# Altium PCB latest_Audio_Meter_V4.5.PcbDoc (part 1 of 4)
Units mil, origin at the board's own origin, x right, y up, seen from the top; angles counter-clockwise.
Board outline 2756.14 x 2519.69 mil, 2 copper layers (Top Layer, Bottom Layer), stack 57.087 mil thick; 115 components, 61 nets, 352 pads, 840 vias.
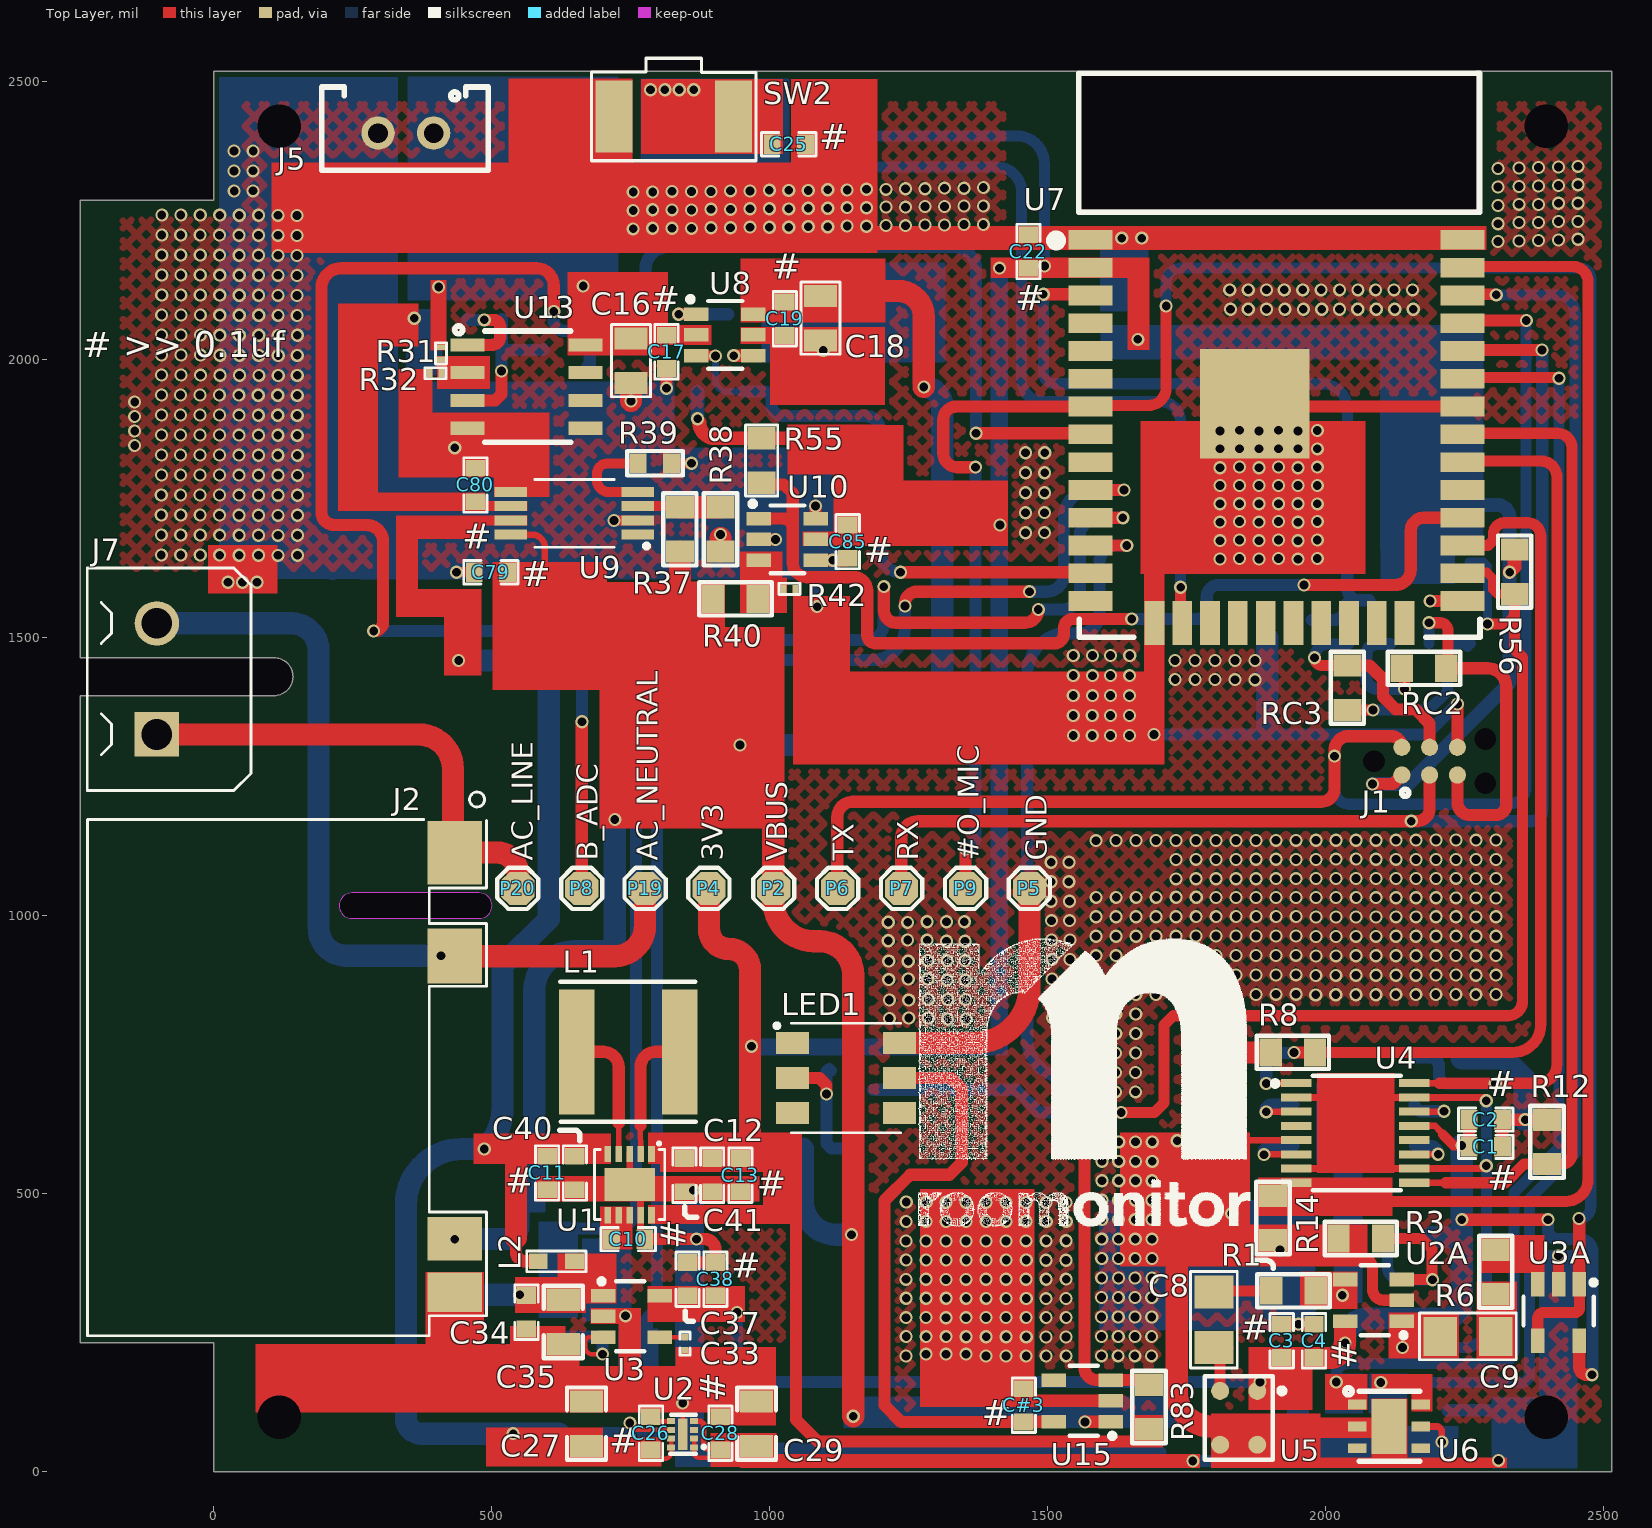
[diagram p0: Top Layer view]
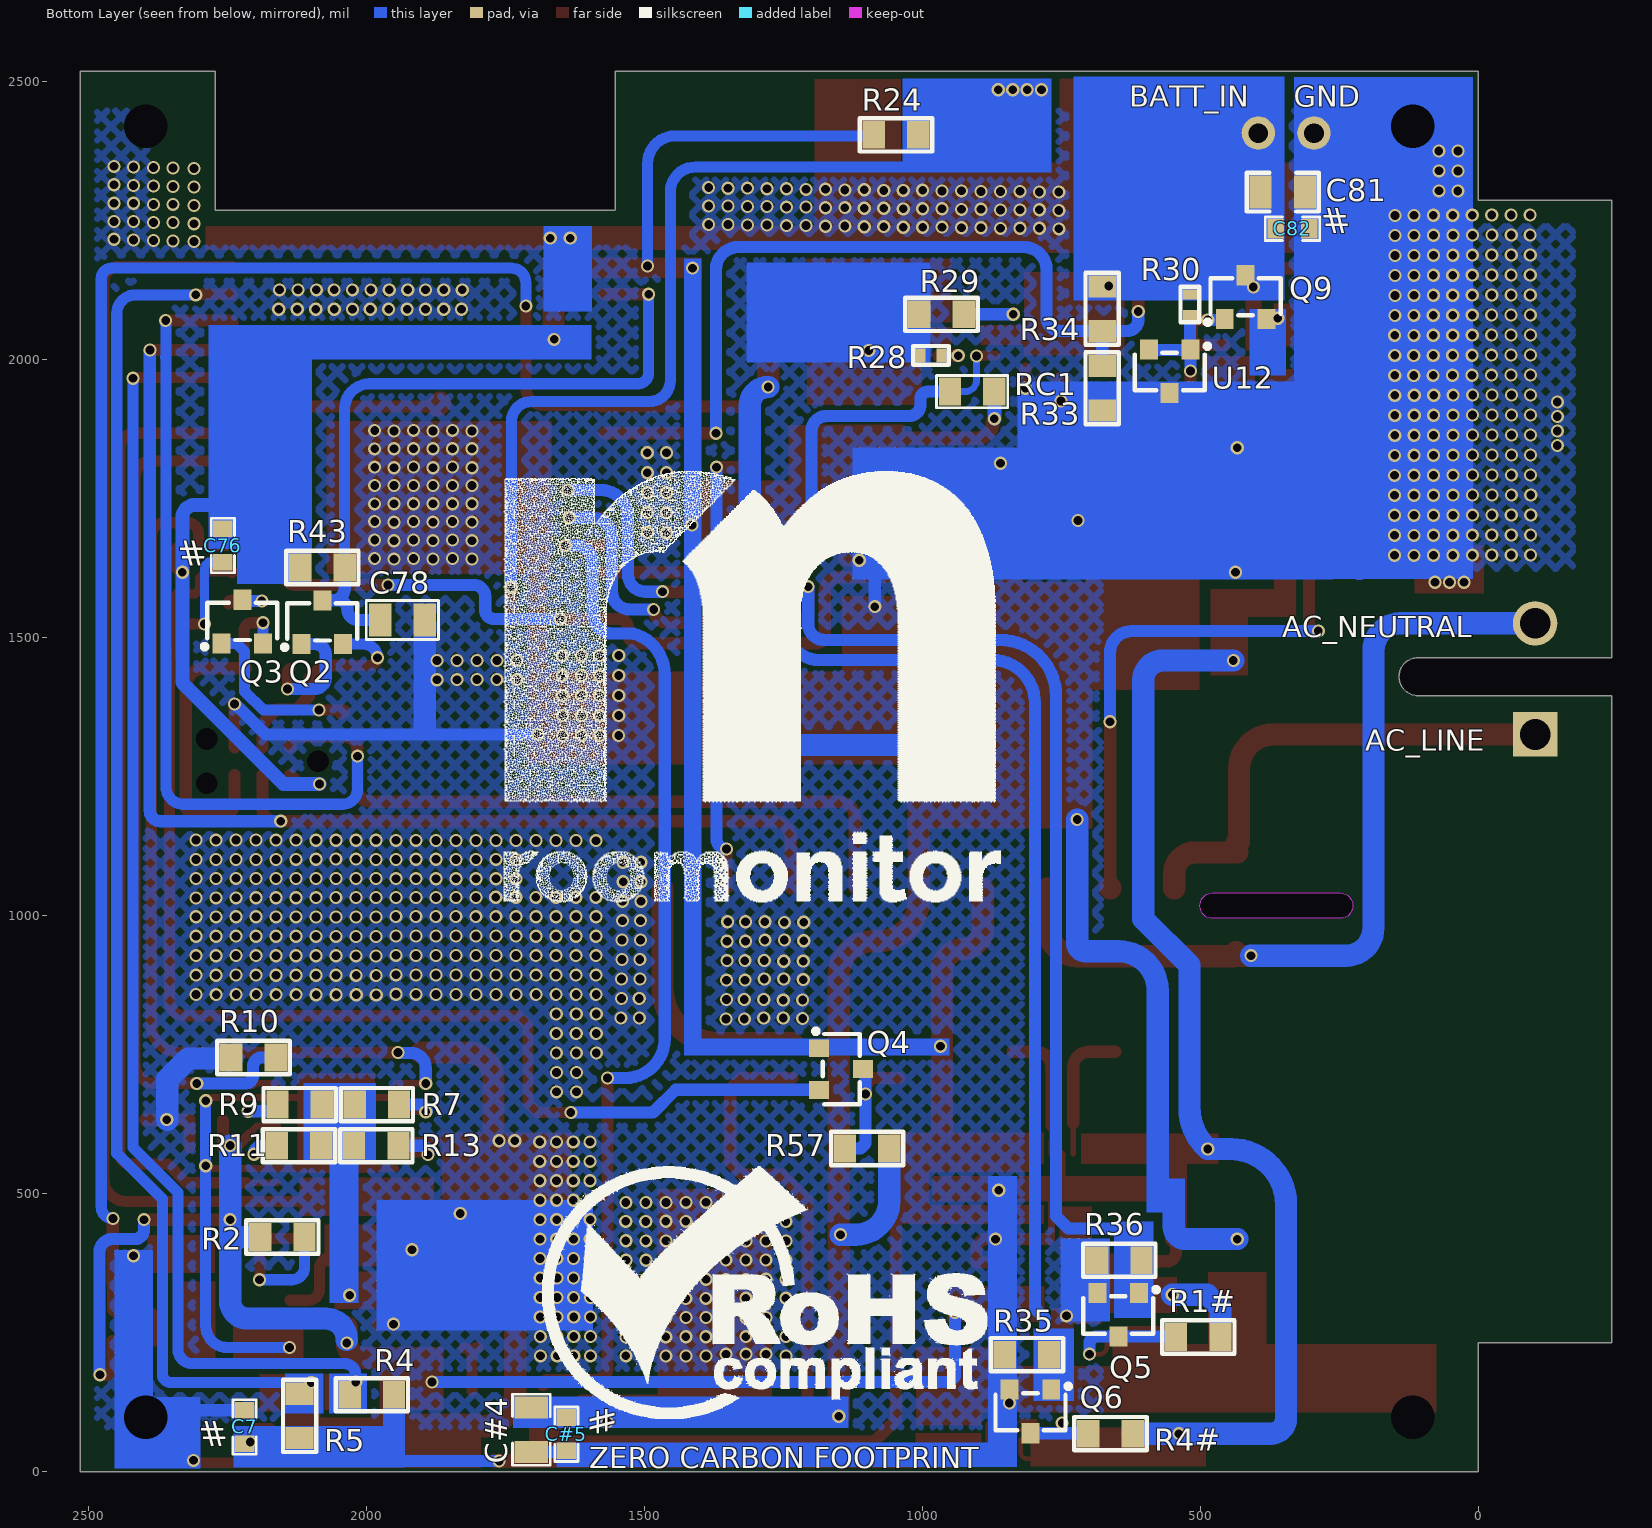
[diagram p1: Bottom Layer view, seen from below]
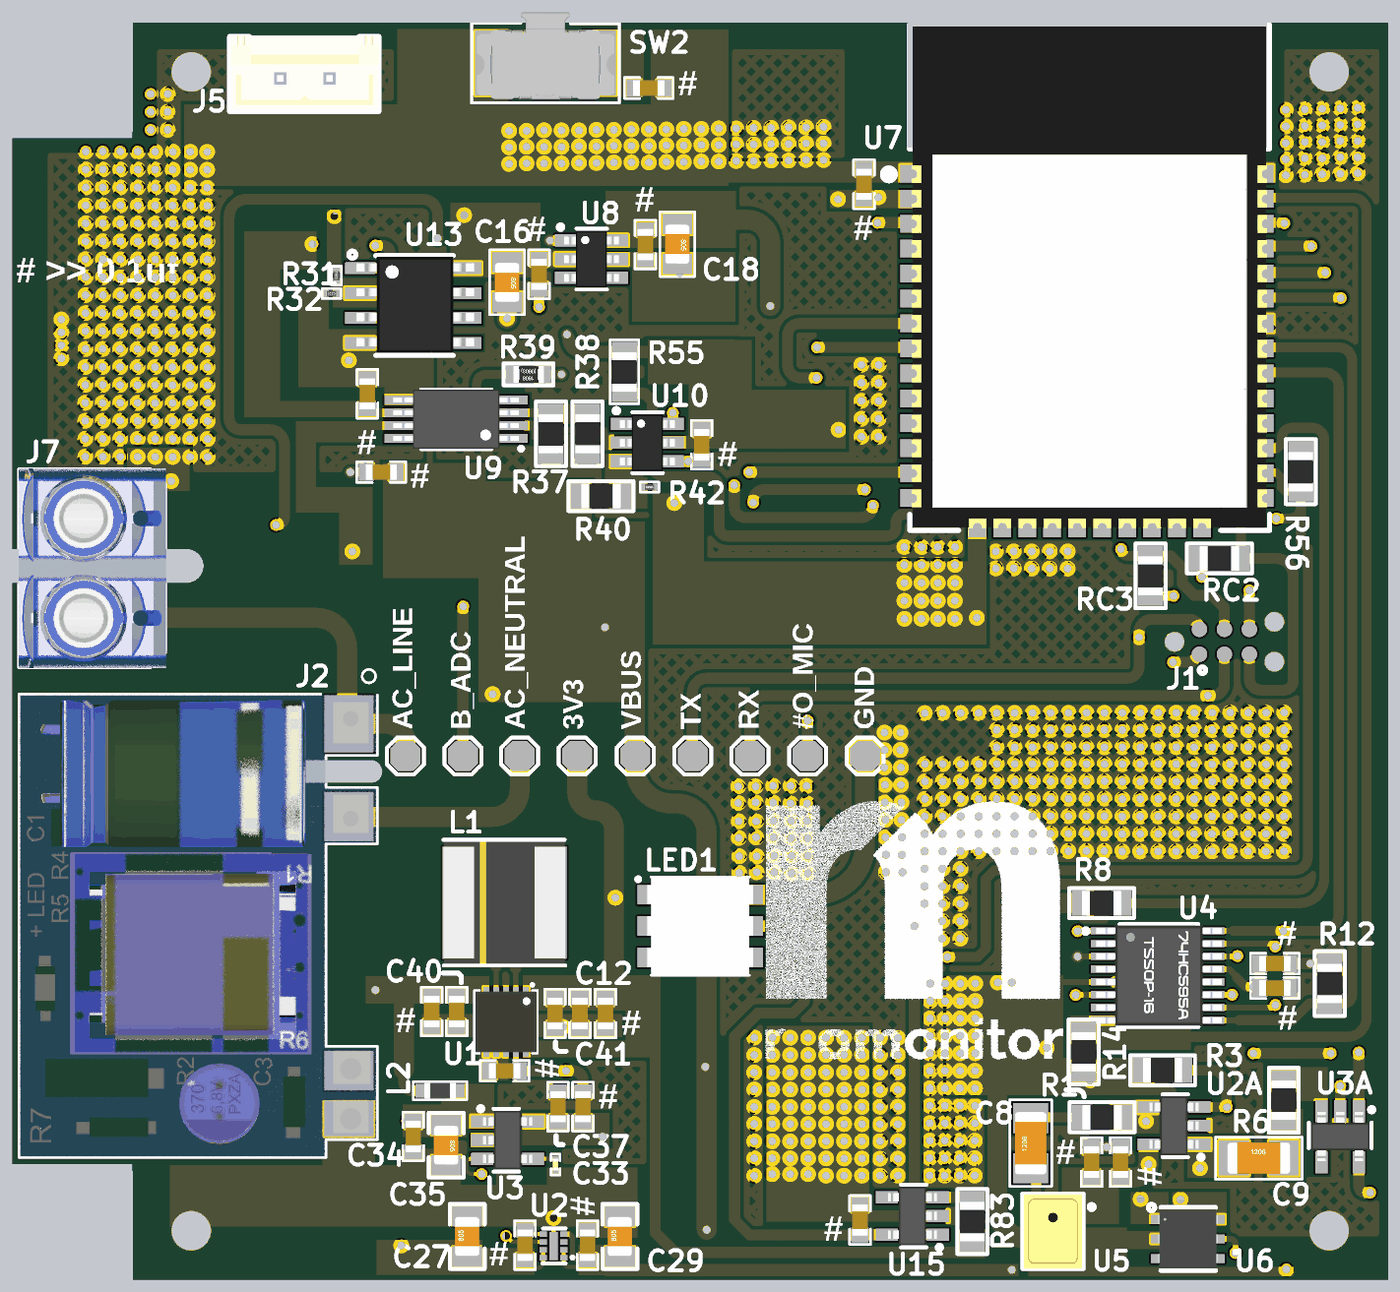
[diagram p3: 3D render of the assembled board from above, using the file's embedded part models]
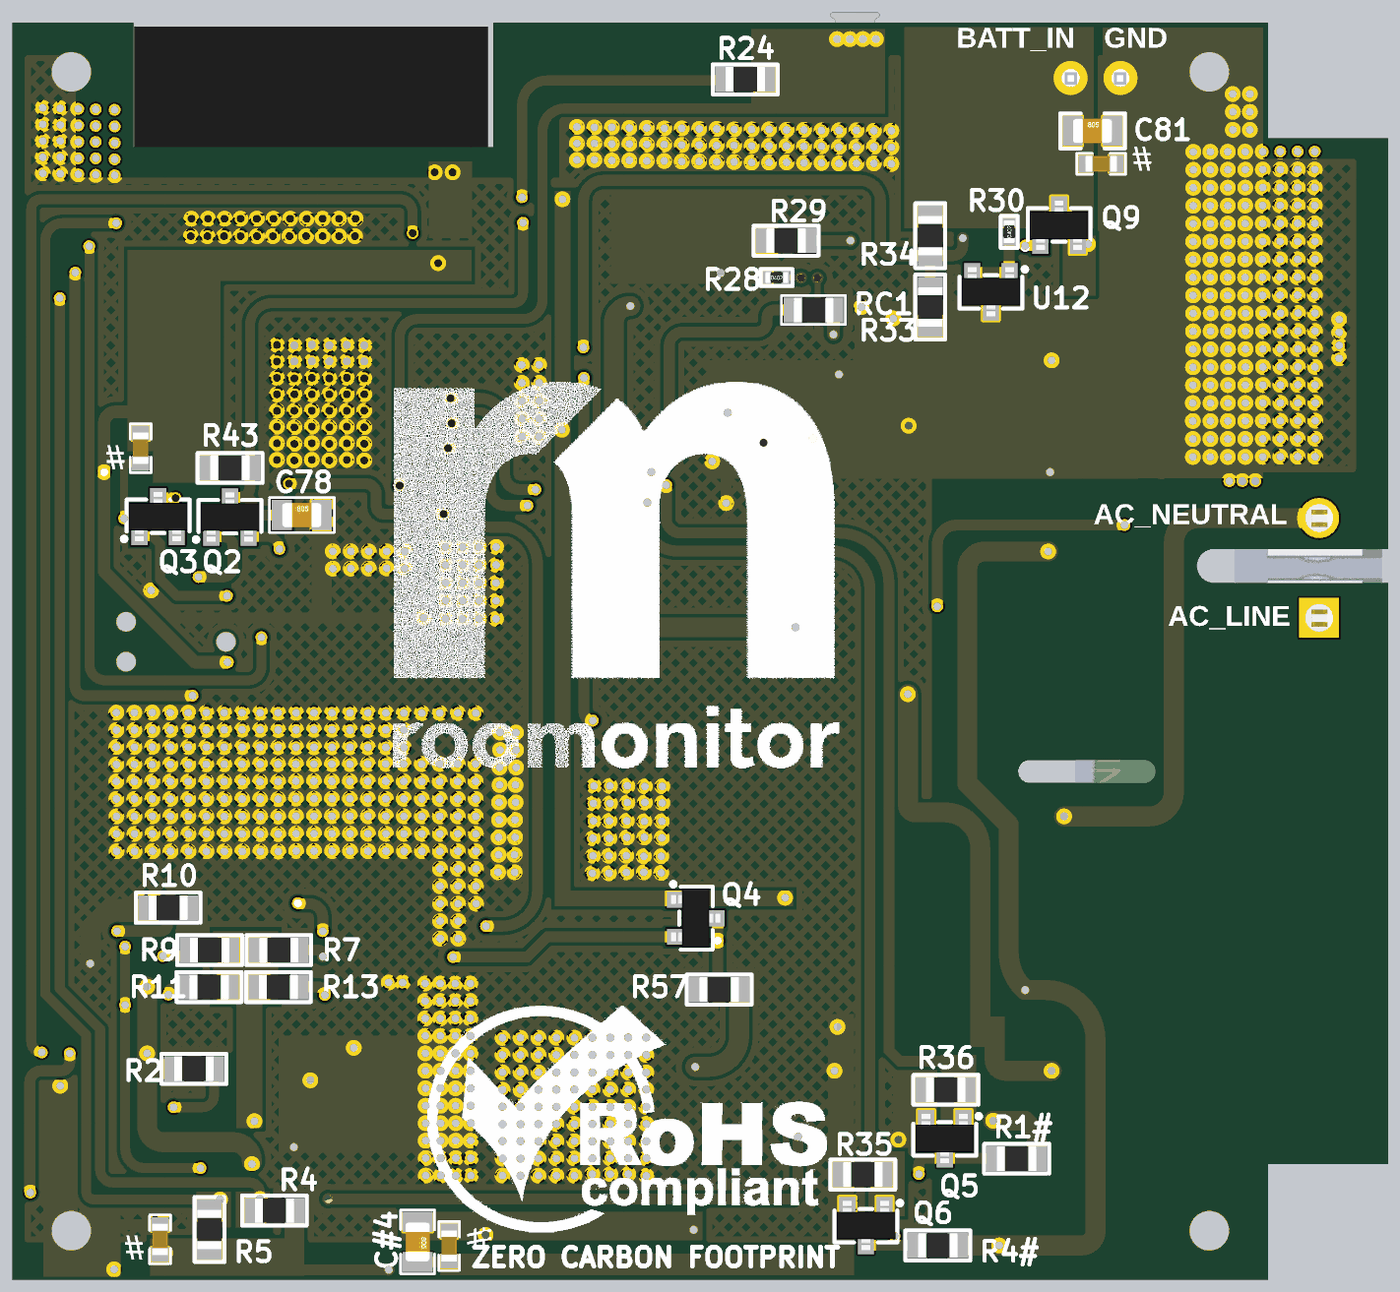
[diagram p4: 3D render of the assembled board from below, using the file's embedded part models]

## Layer stack, top to bottom
Top Solder: solder mask 2.7559, Solder Resist, Dk 3.5
Top Layer: signal copper 13.7795
Dielectric 1: dielectric 29.5276, FR-4, Dk 4.8
Bottom Layer: signal copper 13.7795
Bottom Solder: solder mask 3.1496, Solder Resist, Dk 3.5

## Board outline
-240.16,231.28 0,231.28 0,-0.69 2515.98,-0.68 2515.98,2519 2273,2519 2273,2269 1553,2269 1553,2519 0,2519 0,2287.03 -240.16,2287.03 -240.16,1464 109,1464 cw(c109,1430) 143,1430 cw(c109,1430) 109,1396 -240.16,1396
cut-out: 226,1018 ccw(c249,1018) 249,995 478,995 ccw(c478,1018) 501,1018 ccw(c478,1018) 478,1041 249,1041 ccw(c249,1018)

## Design rules (kind name [scope] priority, off if disabled: settings)
Clearance [All] p1: gap=7 ignorepadtopadclearanceinfootprint=FALSE except(3: Arc-SMDPad Track-SMDPad SMDPad-SMDPad)
ComponentClearance [All] p1: gap=0 collisioncheckmode=3 verticalgap=0 showdistances=FALSE
MinimumSolderMaskSliver [All] p1: minsoldermaskwidth=0
PolygonConnect [All] p1: connectstyle=Direct reliefconductorwidth=10 reliefentries=4 polygonreliefangle="90 Angle" airgapwidth=10
RoutingVias [All] p1: holewidth=15.75 width=23.62 viastyle="Through Hole" minholewidth=15.75 minwidth=23.62 maxholewidth=28 maxwidth=50
SilkToSilkClearance [All] p1: silktosilkclearance=0
SilkToSolderMaskClearance [IsPad] p1: minsilkscreentomaskgap=0 clearancetoexposedcopper=TRUE
SolderMaskExpansion [All] p1: expansion=4
Width [All] p1: maxlimit=40 minlimit=8 preferedwidth=12
26 further rules are at their usual default settings.

## Classes and differential pairs
component class U_SourceSelector_Section: C79 C80 C85 R37 R38 R39 R40 R42 R55 U9 U10
component class U_Supply_Section: J2
component class U_Sensor_Section: C7 C#3 C#4 C#5 LED1 R4 R5 R83 U6 U15
component class U_Power_Section: C10 C11 C12 C13 C27 C28 C29 C34 C35 C37 C38 C40 C41 L1 L2 Q5 Q6 R1# R4# R35 R36 S U1 U2 U3
component class U_Controller_Section: C22 C25 C76 C78 Q2 Q3 Q4 R24 R43 R56 R57 RC2 RC3 SW2 U7
component class U_Connector_Section: C81 C82 J1 J5 J7 P2 P4 P5 P6 P7 P19 P20
component class "U_Battery management Section": C16 C17 C18 C19 P8 Q9 R28 R29 R30 R31 R32 R33 R34 RC1 U8 U12 U13
component class U_Audio_Section: C1 C2 C3 C4 C8 C9 P9 R1 R2 R3 R6 R7 R8 R9 R10 R11 R12 R13 R14 U2A U3A U4 U5

## Components (designator, comment, footprint, x,y, rotation, side; value= is the part's Value field where it differs from the comment)
C1 "0.1uF" Cap0603 2289,584 r0 top
C2 "0.1uF" Cap0603 2289,633 r0 top
C3 "0.1uF" Cap0603 1922,235 r90 top
C4 "0.1uF" Cap0603 1980,235 r90 top
C7 "0.1uF" Cap0603 2220,80 r90 bottom
C8 "1206YC105K4T2A" Cap1206 1800,273 r90 top
C9 "1206YC105K4T2A" Cap1206 2257,243 r0 top
C10 "0.1uF" Cap0603 746,418 r0 top
C11 "0.1uF" Cap0603 600,537 r270 top
C12 "10uF" Cap0603 897,533 r270 top
C13 "0.1uF" Cap0603 948,533 r270 top
C16 "1uF" Cap0805#1 751,1998.57 r270 top
C17 "0.1uF" Cap0603 815,2014.57 r270 top
C18 "1uF" Cap0805#1 1092,2075 r270 top
C19 "0.1uF" Cap0603 1028,2074 r270 top
C22 "0.1uF" Cap0603 1466,2195 r90 top
C25 "0.1uF" Cap0603 1035,2388 r0 top
C26 "0.1uF" Cap0603 787,68.56 r90 top
C27 "1uF" Cap0805#2 671,86 r90 top
C28 "0.1uF" Cap0603 912,68.56 r90 top
C29 "1uF" Cap0805#2 977,86 r90 top
C33 "10nF" "CAP 0201" 848,230 r270 top
C34 "10uF" Cap0603 563,286.44 r270 top
C35 "1uF" Cap0805#2 629,269 r270 top
C37 "10uF" Cap0603 853,346 r90 top
C38 "0.1uF" Cap0603 903,346 r90 top
C40 "10uF" Cap0603 650,537 r270 top
C41 "10uF" Cap0603 847,533 r270 top
C76 "0.1uF" Cap0603 2259,1666 r270 bottom
C78 "1uF" Cap0805#1 1936,1532 r180 bottom
C79 "0.1uF" Cap0603 499,1618 r180 top
C80 "0.1uF" Cap0603 471,1775 r90 top
C81 "4.7UF" Cap0805#2 352,2302 r180 bottom
C82 "0.1uF" Cap0603 334.56,2236 r180 bottom
C85 "0.1uF" Cap0603 1141,1673 r270 top
C#3 "0.1uF" Cap0603 1458,119 r90 top
C#4 "1uF" Cap0805#2 1704,75 r270 bottom
C#5 "0.1uF" Cap0603 1641,67 r270 bottom
J1 "TC2030-IDC" TC2030-IDC 2188,1278 r0 top
J2 "SMD Header" "SMD Header" 434.08,721 r90 top locked
J5 "B2B-EH-A(LF)(SN)" B2B-EH-A(LF)(SN) 346,2408 r180 top
J7 "Terminal Block 2POS" "Terminal Block 2P" -102,1326 r90 top
L1 "NR6028T1R5N" NR6028T1R5N 746,755 r0 top
L2 "BLM18SG121TN1D" "IND 0603" 617,378 r0 top
LED1 "COM-11821" COM-11821 1138,708 r0 top locked
P2 "TEST POINT" "TEST POINT" 1007.75,1049 r180 top
P4 "TEST POINT" "TEST POINT" 891.38,1049 r0 top
P5 "TEST POINT" "TEST POINT" 1468,1049 r0 top
P6 "TEST POINT" "TEST POINT" 1122.81,1049 r0 top
P7 "TEST POINT" "TEST POINT" 1237.88,1049 r0 top
P8 "TEST POINT" "TEST POINT" 662.56,1049 r90 top
P9 "TEST POINT" "TEST POINT" 1352.94,1049 r270 top
P19 "TEST POINT" "TEST POINT" 776.31,1049 r270 top
P20 "TEST POINT" "TEST POINT" 547.5,1049 r0 top
Q2 "MMBT2222A-7-F" SOT-23 2080,1528 r180 bottom
Q3 "MMBT2222A-7-F" SOT-23 2224,1529 r180 bottom
Q4 "BSS138LT1G" SOT-23 1147,724 r270 bottom
Q5 "BSS138LT1G" SOT-23 648,282 r0 bottom
Q6 "BSS138LT1G" SOT-23 806,108 r0 bottom
Q9 "PMV65XP,215" SOT-23 419,2113 r180 bottom
R1 "1K" "RES 0805" 1943,325 r0 top
R1# "10K" "RES 0805" 504,242 r180 bottom
R2 "10K" "RES 0805" 2152,422 r0 bottom
R3 "10K" "RES 0805" 2064,419 r180 top
R4 "10K" "RES 0805" 1991,138 r180 bottom
R4# "10K" "RES 0805" 662,68 r180 bottom
R5 "10K" "RES 0805" 2121,100 r270 bottom
R6 "1K" "RES 0805" 2307,359 r270 top
R7 "47K" "RES 0805" 1982,660 r0 bottom
R8 "10K" "RES 0805" 1942,754 r0 top
R9 "100K" "RES 0805" 2121,660 r180 bottom
R10 "10K" "RES 0805" 2204,745 r180 bottom
R11 "220K" "RES 0805" 2122,586 r180 bottom
R12 "10K" "RES 0805" 2399,593 r270 top
R13 "470K" "RES 0805" 1983,586 r0 bottom
R14 "10K" "RES 0805" 1906,456 r90 top
R24 "10K" "RES 0805" 1048,2405 r0 bottom
R28 "665R" Res0402 985,2008 r180 bottom
R29 "10K" "RES 0805" 966,2082 r180 bottom
R30 "30.9K" Res0402 519,2099.5 r90 bottom
R31 "28K" Res-0201 409.17,2011.83 r90 top
R32 "20K" Res-0201 399.17,1976 r180 top
R33 "1M" "RES 0805" 677,1949 r270 bottom
R34 "1M" "RES 0805" 677,2092 r90 bottom
R35 "10K" "RES 0805" 812.33,210 r0 bottom
R36 "10K" "RES 0805" 646,380 r0 bottom
R37 "10K" "RES 0805" 839,1695 r270 top
R38 "10K" "RES 0805" 912,1695 r90 top
R39 "400R" Res0603 794,1814 r0 top
R40 "10K" "RES 0805" 939,1570 r180 top
R42 "20K" Res-0201 1036.17,1588 r0 top
R43 "10K" "RES 0805" 2080,1626.44 r0 bottom
R55 "10K" "RES 0805" 986,1819 r270 top
R56 "10K" "RES 0805" 2341,1619 r270 top
R57 "10K" "RES 0805" 1100,581 r0 bottom
R83 "10K" "RES 0805" 1683,116 r90 top
RC1 "10K" "RES 0805" 911,1943 r180 bottom
RC2 "10K" "RES 0805" 2178,1445 r0 top
RC3 "10K" "RES 0805" 2040,1410 r90 top
SW2 "Switch" KSS221GLFS 828,2438 r180 top
U1 "TPS63031DSKR" TPS63031DSKR 748.63,516.12 r270 top
U2 "NCP186AMX330TAG" NCP186AMX330TAG 844,67 r180 top
U2A "OPA344NA/250" SOT23-5 2087,308 r180 top locked
U3 "LP2985A-33DBVT" SOT23-5 752,279 r0 top
U3A "OPA344NA/250" SOT23-5 2420,286 r270 top locked
U4 "ADG712BRUZ-REEL" 16-TSSOP 2057,609 r0 top locked
U5 "SPU0410HR5H-PB" SPU0410HR5H-PB 1811.07,145 r0 top locked
U6 "SI7021-A20-GM1R" SI7021-A20-GM1R 2115,81 r0 top
U7 "ESP32-WROOM-32 (16MB)" "ESP32-WROOM-32 (16MB)" 1912.65,1871.31 r0 top
U8 "BQ21040DBVR" SOT-23-6 920,2045 r0 top
U9 "TPS2111APWR" 8-TSSOP 649,1724 r180 top
U10 "TPS3711DDCT" SOT-23-6 1032,1677 r0 top
U12 "TLV431BFTA" SOT-23 555.6,1979.63 r0 bottom
U13 "LM393DT" LM393DT 563,1952 r0 top
U15 "MIC2004-0.5YM5-TR" SOT23-5 1563,127 r180 top

## Footprints (in the part's own frame and the unit in brackets; to place one, negate y for a bottom-side part, rotate by r counter-clockwise, add the part's x,y. Pads: shape width x height; smd on the part's side, far side on the other; paste and mask are expansions set on the pad)
8-TSSOP [mm]
  rect 1.5x0.45 smd: 1(-2.9,0.975) 2(-2.9,0.325) 3(-2.9,-0.325) 4(-2.9,-0.975) 5(2.9,-0.975) 6(2.9,-0.325) 7(2.9,0.325) 8(2.9,0.975)
  silkscreen extent -3.38,-1.55 1.8,1.57, body extent -3.2,-1.5 3.2,1.5, height 1.2
16-TSSOP [mm]
  rect 1.4x0.37 smd: 1(-2.775,2.275) 2(-2.775,1.625) 3(-2.775,0.975) 4(-2.775,0.325) 5(-2.775,-0.325) 6(-2.775,-0.975) 7(-2.775,-1.625) 8(-2.775,-2.275) 9(2.625,-2.275) 10(2.625,-1.625) 11(2.625,-0.975) 12(2.625,-0.325) 13(2.625,0.325) 14(2.625,0.975) 15(2.625,1.625) 16(2.625,2.275)
  silkscreen extent -3.85,-2.62 2.01,2.62, body extent -3.2,-2.55 3.2,2.55, height 1.2
B2B-EH-A(LF)(SN) [mil]
  round 60 hole 35.43: 1(-50,0) 2(50,0)
  silkscreen extent -148,-83 151,67, body extent -148,-86 148,64, height 244
Cap0603 [mil]
  rect 30x35 smd mask+2.36: 1(-30,0) 2(30,0)
  silkscreen extent -49,-21 49,21, body extent -32,-16 31,16, height 34
Cap0805#1 [mil] "SMD 0805"
  rect 40x60 smd: 1(-40,0) 2(40,0)
  silkscreen extent -65,-35 65,35, body extent -39,-25 39,25, height 30
Cap0805#2 [mil] "SMD 0805"
  rect 40x60 smd mask+2.76: 1(-40,0) 2(40,0)
  silkscreen extent -65,-35 65,35, body extent -39,-25 39,25, height 30
Cap1206 [mil] "SMD 1206"
  rect 60x70 smd: 1(-50,0) 2(50,0)
  silkscreen extent -87,-42 87,42, body extent -63,-31 63,32, height 39
"CAP 0201" [mm]
  rect 0.3x0.3 smd: 1(-0.3,0) 2(0.3,0)
  silkscreen extent -0.53,-0.23 0.53,0.23, body extent -0.3,-0.15 0.3,0.15, height 0.28
COM-11821 [mm]
  rect 1.5x1 smd: 1(-2.45,1.6) 2(-2.45,0) 3(-2.45,-1.6) 4(2.45,-1.6) 5(2.45,0) 6(2.45,1.6)
  silkscreen extent -3.26,-2.5 2.5,2.5, body extent -2.7,-2.5 2.7,2.5, height 1.75
"ESP32-WROOM-32 (16MB)" [mm]
  rect 2x0.9 smd: 1(-8.5,8.755) 2(-8.5,7.485) 3(-8.5,6.215) 4(-8.5,4.945) 5(-8.5,3.675) 6(-8.5,2.405) 7(-8.5,1.135) 8(-8.5,-0.135) 9(-8.5,-1.405) 10(-8.5,-2.675) 11(-8.5,-3.945) 12(-8.5,-5.215) 13(-8.5,-6.485) 14(-8.5,-7.755) 25(8.5,-7.755) 26(8.5,-6.485) 27(8.5,-5.215) 28(8.5,-3.945) 29(8.5,-2.675) 30(8.5,-1.405) 31(8.5,-0.135) 32(8.5,1.135) 33(8.5,2.405) 34(8.5,3.675) 35(8.5,4.945) 36(8.5,6.215) 37(8.5,7.485) 38(8.5,8.755)
  rect 0.9x2 smd: 15(-5.58,-8.755) 16(-4.31,-8.755) 17(-3.04,-8.755) 18(-1.77,-8.755) 19(-0.5,-8.755) 20(0.77,-8.755) 21(2.04,-8.755) 22(3.31,-8.755) 23(4.58,-8.755) 24(5.85,-8.755)
  rect 5x5 smd: 39(-0.991,1.27)
  silkscreen extent -10.28,-9.4 9.3,16.38, body extent -8.91,-9.3 9.16,16.24, height 3.01
"IND 0603" [mm]
  rect 0.85x0.7 smd: 1(-0.825,0) 2(0.825,0)
  silkscreen extent -1.36,-0.47 1.35,0.47, body extent -0.8,-0.4 0.8,0.4, height 0.8
KSS221GLFS [mil] "Tactile Switch SPST-NO Side Actuated Surface Mount, Right Angle"
  rect 66.93x130 smd: 1(-107.3,0) 2(107.3,0)
  silkscreen extent -148,-105 148,80, body extent -138,-101 138,72, height 65
LM393DT [mm]
  rect 1.55x0.6 smd: 1(-2.7,1.905) 2(-2.7,0.635) 3(-2.7,-0.635) 4(-2.7,-1.905) 5(2.7,-1.905) 6(2.7,-0.635) 7(2.7,0.635) 8(2.7,1.905)
  silkscreen extent -3.28,-2.54 2.03,2.77, body extent -2.91,-2.41 3.09,2.49, height 1.65
NCP186AMX330TAG [mm]
  rect 0.37x0.28 smd: 1(-0.525,0.6) 2(-0.525,0.2) 3(-0.525,-0.2) 4(-0.525,-0.6) 5(0.525,-0.6) 6(0.525,-0.2) 7(0.525,0.2) 8(0.525,0.6)
  rect 0.44x1.44 smd: 9(0,0)
  silkscreen extent -1.02,-0.89 0.56,0.89, body extent -0.6,-0.8 0.6,0.8, height 0.39
NR6028T1R5N [mm] "FIXED IND 1.5UH 4.2A 20.8 MOHM"
  rect 1.62x5.72 smd: 1(-2.35,0) 2(2.35,0)
  silkscreen extent -3.11,-3.2 3.09,3.2, body extent -3.11,-3.1 3.09,3.1, height 2.79
Res0402 [mil]
  rect 18x25 smd mask+4: 1(-18.5,0) 2(18.5,0)
  silkscreen extent -32,-17 32,17, body extent -23,-11 23,11, height 16
Res0603 [mil]
  rect 30x35 smd: 1(-30,0) 2(30,0)
  silkscreen extent -50,-22 50,22, body extent -31,-17 31,17, height 18
"RES 0805" [mil] "SMD 0805"
  rect 40x50 smd: 1(-40,0) 2(40,0)
  silkscreen extent -65,-30 65,30, body extent -39,-25 39,24, height 24
Res-0201 [mm]
  rect 0.27x0.37 smd: 1(-0.275,0) 2(0.275,0)
  silkscreen extent -0.48,-0.25 0.48,0.25, body extent -0.3,-0.15 0.3,0.15, height 0.29
SI7021-A20-GM1R [mm]
  rect 0.85x0.45 smd: 1(-1.45,1) 2(-1.45,0) 3(-1.45,-1) 4(1.45,-1) 5(1.45,0) 6(1.45,1)
  rect 1.6x2.5 smd: 7(0,0)
  silkscreen extent -2.02,-1.6 1.4,1.76, body extent -1.5,-1.5 1.5,1.5, height 1.22
"SMD Header" [mm]
  rect 2.9x2.5 smd: 1(9.97,0)
  rect 2.5x2.5 smd: 2(5.245,0)
  rect 2x2.5 smd: 3(-7.683,0)
  rect 1.8x2.5 smd: 4(-10.122,0)
  silkscreen extent -12.12,-1.45 12.74,16.79, body extent -12.07,-1.4 11.43,16.75, height 12.59
SOT23-5 [mm] "SOT23-5 Package"
  rect 1.12x0.62 smd: 1(-1.3,0.95) 2(-1.3,0) 3(-1.3,-0.95) 4(1.3,-0.95) 5(1.3,0.95)
  silkscreen extent -1.48,-1.6 0.58,1.71, body extent -1.25,-1.5 1.25,1.5, height 1.09
SOT-23 [mm]
  rect 0.82x0.92 smd: 1(-0.95,-1) 2(0.95,-1) 3(0,1)
  silkscreen extent -1.82,-1.23 1.6,0.86, body extent -1.5,-1.25 1.5,1.25, height 1.1
SOT-23-6 [mm]
  rect 1.12x0.62 smd: 1(-1.3,0.95) 2(-1.3,0) 3(-1.3,-0.95) 4(1.3,-0.95) 5(1.3,0) 6(1.3,0.95)
  silkscreen extent -1.69,-1.55 0.79,1.74, body extent -1.4,-1.45 1.4,1.45, height 1.42
SPU0410HR5H-PB [mm]
  round 0.82 smd: 1(1.7,0) 2(1.7,-2.46) 3(0,-2.46) 4(0,0)
  silkscreen extent -0.71,-3.15 2.95,0.67, body extent -0.62,-3.11 2.33,0.65, height 1.03
TC2030-IDC [mil] "CABLE ADAPTER 6 POS"
  round 30.98 smd: 1(-50,-25) 1(-50,-25) 2(-50,25) 3(0,-25) 4(0,25) 5(50,-25) 6(50,25)
  round 0 hole 39.02: MP5(-100,0) MP6(100,-40) MP7(100,40)
  silkscreen extent -50,-63 -38,-51
"Terminal Block 2P" [mil] "TERMINAL BLOCK 2POS 5.08MM SIDE"
  rect 80x80 hole 55: 1(0,0)
  round 80 hole 55: 2(200,0)
  silkscreen extent -101,-169 299,125, body extent -101,-170 299,125, height 394
"TEST POINT" [mil]
  oct 60x60 smd: 1(0,0)
  silkscreen extent -37,-37 37,37
TPS63031DSKR [mm] "Conv DC-DC 1.8V to 5.5V Non-Inv/Inv/Step Up/Step Down Single-Out 3.3V 0.8A 10-Pin WSON"
  rect 0.75x0.3 smd: 1(-1.4,1) 2(-1.4,0.5) 3(-1.4,0) 4(-1.4,-0.5) 5(-1.4,-1) 6(1.4,-1) 7(1.4,-0.5) 8(1.4,0) 9(1.4,0.5) 10(1.4,1)
  rect 1.5x2.3 smd: 11(0,0)
  silkscreen extent -1.96,-1.6 1.6,1.6, body extent -1.56,-1.55 1.56,1.55, height 0.8

## Part data
C1 C2 C3 C4 C7 C10 C11 C13 C17 C19 C22 C25 C26 C28 C38 C76 C79 C80 C82 C85 C#3 C#5: library part CC0603ZRY5V9BB104, "CAP CER 0.1UF 50V Y5V 0603", Capacitance=100nF, Case/Package=0603, Case Code (Metric)=1608, Dielectric=Y5V, Manufacturer=Yageo, Max Operating Temperature=85°C, Min Operating Temperature=-30°C, Package Quantity=1, Supplier Part Number 1=311-1343-1-ND, Tolerance=80%, Voltage=50V, Case Code (Imperial)=0603, ComponentLink1Description=http://www.yageo.com/documents/recent/UPY-GPHC_Y5V_6.3V-to-50V_8.pdf?src-supplier=Digi-Key, ComponentLink1URL=http://www.yageo.com/documents/recent/UPY-GPHC_Y5V_6.3V-to-50V_8.pdf?src-supplier=Digi-Key, ComponentLink2Description=http://www.yageo.com/documents/recent/UPY-GPHC_Y5V_6.3V-to-50V_5.pdf?src-supplier=Avnet+Europe, ComponentLink2URL=http://www.yageo.com/documents/recent/UPY-GPHC_Y5V_6.3V-to-50V_5.pdf?src-supplier=Avnet+Europe, ComponentLink3Description=https://www.verical.com/server-webapp/html/getDatasheet?partID=403611&src-supplier=Verical, ComponentLink3URL=https://www.verical.com/server-webapp/html/getDatasheet?partID=403611&src-supplier=Verical, ComponentLink4Description=http://www.mouser.com/ds/2/447/Yageo_UPY-GP_NP0_16V-to-50V_9-358835.pdf?src-supplier=Mouser, ComponentLink4URL=http://www.mouser.com/ds/2/447/Yageo_UPY-GP_NP0_16V-to-50V_9-358835.pdf?src-supplier=Mouser, ComponentLink5Description=http://www.farnell.com/datasheets/1132289.pdf?src-supplier=Element14, ComponentLink5URL=http://www.farnell.com/datasheets/1132289.pdf?src-supplier=Element14, Composition=Ceramic, Depth=0.8mm, Halogen Free="Halogen Free", Height=0.8mm, Lead Free="Lead Free", Length=1.6mm, Manufacturer Part Number=CC0603ZRY5V9BB104, Mount="Surface Mount", Number of Pins=2, Packaging="Tape and Reel", Pricing 1="1=0.1, 10=0.075, 100=0.0334, 500=0.02386, 1000=0.01874 (USD)", Radiation Hardening=No, REACH SVHC="No SVHC", Stock 1=15000880, Supplier 1=Digi-Key, Termination=SMD/SMT, Thickness=0.035inch, Voltage Rating=50V, Voltage Rating (DC)=50V, Width=0.031inch
C8 C9: "CAP CER 1UF 16V X7R 1206", Capacitance=1uF, Case/Package=1206, Case Code (Metric)=3216, Dielectric=X7R, Manufacturer="Kyocera AVX", Max Operating Temperature=125°C, Min Operating Temperature=-55°C, Package Quantity=2000, Ratings=AEC-Q200, Supplier Part Number 1=478-10899-1-ND, Tolerance=10%, Voltage Rating=16V, Case Code (Imperial)=1206, ComponentLink1Description=http://www.mouser.com/ds/2/40/AutoMLCC-777028.pdf?src-supplier=Mouser, ComponentLink1URL=http://www.mouser.com/ds/2/40/AutoMLCC-777028.pdf?src-supplier=Mouser, ComponentLink2Description=http://www.avxcorp.com/docs/Catalogs/cauto.pdf?src-supplier=Avnet, ComponentLink2URL=http://www.avxcorp.com/docs/Catalogs/cauto.pdf?src-supplier=Avnet, ComponentLink3Description=http://www.avx.com/docs/Catalogs/cauto.pdf?src-supplier=Future+Electronics, ComponentLink3URL=http://www.avx.com/docs/Catalogs/cauto.pdf?src-supplier=Future+Electronics, ComponentLink4Description=http://www.avx.com/docs/Catalogs/cx7r.pdf?src-supplier=Digi-Key, ComponentLink4URL=http://www.avx.com/docs/Catalogs/cx7r.pdf?src-supplier=Digi-Key, Depth=1.6mm, Lead Free="Lead Free", Length=3.2mm, Manufacturer Part Number=1206YC105K4T2A, Mount="Surface Mount", Packaging="Tape and Reel", Pricing 1="1=0.41, 10=0.285, 100=0.1708, 500=0.12808, 1000=0.10816 (USD)", Radiation Hardening=No, Stock 1=1895, Supplier 1=Digi-Key, Termination=SMD/SMT, Thickness=0.037inch, Voltage Rating (DC)=16V, Width=1.6mm
C12 C34 C37 C40 C41: library part C1608X5R1E106M080AC, "CAP CER 10UF 25V X5R 0603", Case/Package=0603, Case Code (Metric)=1608, Dielectric=X5R, Dielectric Material=Ceramic, Manufacturer=TDK, Max Operating Temperature=85°C, Min Operating Temperature=-55°C, Package Quantity=1, Supplier Part Number 1=445-9015-1-ND, Tolerance=20%, Voltage Rating=25V, Capacitance=10uF, Case Code (Imperial)=0603, Composition=Ceramic, Depth=0.8mm, Height=0.8mm, Lead Free="Lead Free", Length=1.6mm, Manufacturer Part Number=C1608X5R1E106M080AC, Mount="Surface Mount", Packaging="Tape and Reel", Pricing 1="1=0.96, 10=0.704, 100=0.483, 500=0.38238, 1000=0.322 (USD)", REACH SVHC="No SVHC", Stock 1=61681, Supplier 1=Digi-Key, Termination=SMD/SMT, Thickness=0.039inch, Voltage Rating (DC)=25V, Weight=7.1E-05oz, Width=0.8mm
C16 C18 C27 C29 C35 C78 C#4: library part CL21B105KOFNNNG, "CAP CER 1UF 16V X7R 0805", Case/Package=0805, Case Code (Metric)=2012, Dielectric=X7R, Manufacturer=Samsung, Max Operating Temperature=125°C, Min Operating Temperature=-55°C, Package Quantity=3000, Supplier Part Number 1=1276-6471-6-ND, Tolerance=10%, Voltage=16V, Capacitance=1uF, Case Code (Imperial)=0805, ComponentLink1Description=http://www.samsungsem.com/global/support/library/product-catalog/__icsFiles/afieldfile/2014/11/13/MLCC.pdf?src-supplier=Digi-Key, ComponentLink1URL=http://www.samsungsem.com/global/support/library/product-catalog/__icsFiles/afieldfile/2014/11/13/MLCC.pdf?src-supplier=Digi-Key, ComponentLink2Description=http://www1.futureelectronics.com/doc/SAMSUNG%20PASSIVE/CL05B104KQ5NNNC.pdf?src-supplier=Future+Electronics, ComponentLink2URL=http://www1.futureelectronics.com/doc/SAMSUNG%20PASSIVE/CL05B104KQ5NNNC.pdf?src-supplier=Future+Electronics, ComponentLink3Description=https://www.distrelec.biz/Web/Downloads/_e/ng/MLCC_CatalogDownload2013_ENG.pdf?mime=application%2Fpdf&src-supplier=Distrelec, ComponentLink3URL=https://www.distrelec.biz/Web/Downloads/_e/ng/MLCC_CatalogDownload2013_ENG.pdf?mime=application%2Fpdf&src-supplier=Distrelec, ComponentLink4Description=https://produktinfo.conrad.com/datenblaetter/450000-474999/455935-da-01-en-VS_KONDENSATOR_0805.pdf?src-supplier=Conrad, ComponentLink4URL=https://produktinfo.conrad.com/datenblaetter/450000-474999/455935-da-01-en-VS_KONDENSATOR_0805.pdf?src-supplier=Conrad, Depth=1.25mm, Height=1.25mm, Lead Free="Lead Free", Length=2mm, Manufacturer Part Number=CL21B105KOFNNNG, Material=Ceramic, Mount="Surface Mount", Packaging="Tape and Reel", Pricing 1="1=0.1, 10=0.047, 100=0.0211, 500=0.01508, 1000=0.01185 (USD)", Stock 1=507348, Supplier 1=Digi-Key, Thickness=0.053inch, Voltage Rating=16V, Width=0.049inch
C33: library part UMK063BJ103KP-F, "CAP CER 10000PF 50V X5R 0201", Case/Package=0201, Manufacturer="Taiyo Yuden", Max Operating Temperature=85°C, Min Operating Temperature=-55°C, Supplier Part Number 1=587-5953-1-ND, Tolerance=10%, Voltage Rating=50V, Capacitance=10nF, Category="Ceramic Capacitors", ComponentLink1Description=http://www.yuden.co.jp/productdata/catalog/en/mlcc_all_e.pdf?src-supplier=Digi-Key, ComponentLink1URL=http://www.yuden.co.jp/productdata/catalog/en/mlcc_all_e.pdf?src-supplier=Digi-Key, ComponentLink2Description=http://ds.yuden.co.jp/TYCOMPAS/ut/detail.do?productNo=UMK063BJ103KP-F&fileName=UMK063BJ103KP-F_SS&mode=specSheetDownload&src-supplier=Digi-Key, ComponentLink2URL=http://ds.yuden.co.jp/TYCOMPAS/ut/detail.do?productNo=UMK063BJ103KP-F&fileName=UMK063BJ103KP-F_SS&mode=specSheetDownload&src-supplier=Digi-Key, ComponentLink3Description=https://www.yuden.co.jp/productdata/catalog/mlcc01_e.pdf?src-supplier=Digi-Key, ComponentLink3URL=https://www.yuden.co.jp/productdata/catalog/mlcc01_e.pdf?src-supplier=Digi-Key, Length=0.024inch, Manufacturer Part Number=UMK063BJ103KP-F, Mount="Surface Mount", Packaging="Tape and Reel", Pricing 1="1=0.11000, 10=0.07900, 50=0.04280, 100=0.03500, 500=0.02502, 1000=0.01966, 2500=0.01788, 5000=0.01644 (USD)", RoHS=Yes, RoHS Compliant=Yes, Stock 1=16484, Supplier 1=Digi-Key, Thickness=0.013inch, Width=0.012inch
C81: library part C0805C475K4PACTU, "CAP CER 4.7UF 16V 10% X5R 0805", Capacitance=4.7uF, Case/Package=0805, Dielectric=X5R, Dielectric Material=Ceramic, Manufacturer=KEMET, Max Operating Temperature=85°C, Min Operating Temperature=-55°C, Supplier Part Number 1=36X2756, Tolerance=10%, Voltage=16V, ComponentLink1Description=http://www.samsungsem.com/global/support/library/product-catalog/__icsFiles/afieldfile/2014/11/13/MLCC.pdf?src-supplier=Digi-Key, ComponentLink1URL=http://www.samsungsem.com/global/support/library/product-catalog/__icsFiles/afieldfile/2014/11/13/MLCC.pdf?src-supplier=Digi-Key, ComponentLink2Description=http://www1.futureelectronics.com/doc/SAMSUNG%20PASSIVE/CL05B104KQ5NNNC.pdf?src-supplier=Future+Electronics, ComponentLink2URL=http://www1.futureelectronics.com/doc/SAMSUNG%20PASSIVE/CL05B104KQ5NNNC.pdf?src-supplier=Future+Electronics, ComponentLink3Description=https://www.distrelec.biz/Web/Downloads/_e/ng/MLCC_CatalogDownload2013_ENG.pdf?mime=application%2Fpdf&src-supplier=Distrelec, ComponentLink3URL=https://www.distrelec.biz/Web/Downloads/_e/ng/MLCC_CatalogDownload2013_ENG.pdf?mime=application%2Fpdf&src-supplier=Distrelec, ComponentLink4Description=https://produktinfo.conrad.com/datenblaetter/450000-474999/455935-da-01-en-VS_KONDENSATOR_0805.pdf?src-supplier=Conrad, ComponentLink4URL=https://produktinfo.conrad.com/datenblaetter/450000-474999/455935-da-01-en-VS_KONDENSATOR_0805.pdf?src-supplier=Conrad, ComponentLink5Description=http://capacitoredge.kemet.com/capedge2/DataSheet?pn=C0805C475K4PAC7800&src-supplier=Avnet+Europe, ComponentLink5URL=http://capacitoredge.kemet.com/capedge2/DataSheet?pn=C0805C475K4PAC7800&src-supplier=Avnet+Europe, ComponentLink6Description=https://www.verical.com/server-webapp/html/getDatasheet?partID=319476&src-supplier=Verical, ComponentLink6URL=https://www.verical.com/server-webapp/html/getDatasheet?partID=319476&src-supplier=Verical, Depth=1.25mm, Height=1.25mm, Lead Free="Lead Free", Length=2mm, Manufacturer Part Number=C0805C475K4PACTU, Mount="Surface Mount", Packaging="Tape and Reel", Pricing 1="1=0.142, 2500=0.14, 5000=0.139, 10000=0.137 (USD)", Radiation Hardening=No, Stock 1=22500, Supplier 1=Newark, Termination=SMD/SMT, Voltage Rating (DC)=16V
J1: "CABLE ADAPTER 6 POS", Manufacturer=Tag-Connect, Package Quantity=1, Supplier Part Number 1=TC2030-IDC-ND, ComponentLink1Description=http://www.tag-connect.com/Materials/TC2030-MCP%20Datasheet.pdf?src-supplier=Digi-Key, ComponentLink1URL=http://www.tag-connect.com/Materials/TC2030-MCP%20Datasheet.pdf?src-supplier=Digi-Key, Manufacturer Part Number=TC2030-IDC, Pricing 1="1=43.71 (USD)", Stock 1=284, Supplier 1=Digi-Key
J2: "According to module demension"
J5: "CONN HEADER VERT 2POS 2.5MM", Color=Natural, Contact Resistance=20mR, Current Rating=3A, Housing Color=White, Manufacturer=JST, Max Operating Temperature=85°C, Max Voltage Rating (AC)=250V, Min Operating Temperature=-25°C, Supplier Part Number 1=455-1611-ND, ComponentLink1Description=http://uk.rs-online.com/webdocs/05aa/0900766b805aab1f.pdf?src-supplier=RSComponents, ComponentLink1URL=http://uk.rs-online.com/webdocs/05aa/0900766b805aab1f.pdf?src-supplier=RSComponents, ComponentLink2Description=http://www.jst-mfg.com/product/pdf/eng/eEH.pdf?src-supplier=Digi-Key, ComponentLink2URL=http://www.jst-mfg.com/product/pdf/eng/eEH.pdf?src-supplier=Digi-Key, ComponentLink3Description=https://www.verical.com/server-webapp/html/getDatasheet?partID=639961&src-supplier=Verical, ComponentLink3URL=https://www.verical.com/server-webapp/html/getDatasheet?partID=639961&src-supplier=Verical, ComponentLink4Description=http://www1.futureelectronics.com/doc/JST/B2B-EH-A(LF)(SN).pdf?src-supplier=Future+Electronics, ComponentLink4URL=http://www1.futureelectronics.com/doc/JST/B2B-EH-A(LF)(SN).pdf?src-supplier=Future+Electronics, ComponentLink5Description=http://www.produktinfo.conrad.com/datenblaetter/1200000-1299999/001217319-da-01-en-STIFTLEISTE_GERADE_2_POL__RM_25MM.pdf?src-supplier=Conrad, ComponentLink5URL=http://www.produktinfo.conrad.com/datenblaetter/1200000-1299999/001217319-da-01-en-STIFTLEISTE_GERADE_2_POL__RM_25MM.pdf?src-supplier=Conrad, Connector Type="Male Pin,Plug", Contact Material="Copper Alloy,Brass", Contact Mating Length=0.13inch, Contact Plating=Tin,Copper, Depth=3.8mm, Fastening Type=Detent, Gender=Male, Housing Material=Nylon, Lead Free="Lead Free", Length=7.5mm, Manufacturer Part Number=B2B-EH-A(LF)(SN), Max Current Rating=3A, Mount="Through Hole", Number of Contacts=2, Number of Positions=2, Number of Rows=1, Orientation=Straight, Packaging=Bulk, Pitch=2.5mm, Pricing 1="1=0.14, 10=0.131, 100=0.0809, 500=0.06698, 1000=0.05861, 5000=0.05024, 10000=0.04884 (USD)", Stock 1=25023, Supplier 1=Digi-Key, Termination=Press-Fit, Voltage Rating=250V
J7: "TERMINAL BLOCK 2POS 5.08MM SIDE", Manufacturer="TE Connectivity", Manufacturer P/N=1776493-2
L1: "FIXED IND 1.5UH 4.2A 20.8 MOHM", Case/Package=2424, Current Rating=920mA, DC Resistance (DCR)=390mR, Inductance=47uh, Inductance Tolerance=20%, Manufacturer="Taiyo Yuden", Manufacturer Part Number=NR6028T470M, Max Operating Temperature=120°C, Min Operating Temperature=-25°C, Package Quantity=2000, Saturation Current=950mA, Self Resonant Frequency=8MHz, Supplier Part Number 1=587-2104-1-ND, Test Frequency=100kHz, ComponentLink1Description=https://www.yuden.co.jp/productdata/catalog/wound04_e.pdf?src-supplier=Avnet, ComponentLink1URL=https://www.yuden.co.jp/productdata/catalog/wound04_e.pdf?src-supplier=Avnet, ComponentLink2Description=https://www.yuden.co.jp/productdata/catalog/wound04_e.pdf?src-supplier=Digi-Key, ComponentLink2URL=https://www.yuden.co.jp/productdata/catalog/wound04_e.pdf?src-supplier=Digi-Key, ComponentLink3Description=https://www.yuden.co.jp/productdata/catalog/wound04_e.pdf?src-supplier=Onlinecomponents.com, ComponentLink3URL=https://www.yuden.co.jp/productdata/catalog/wound04_e.pdf?src-supplier=Onlinecomponents.com, ComponentLink4Description=https://www.yuden.co.jp/productdata/catalog/wound04_e.pdf?src-supplier=Mouser, ComponentLink4URL=https://www.yuden.co.jp/productdata/catalog/wound04_e.pdf?src-supplier=Mouser, Composition=Wirewound, Core Material=Ferrite, Halogen Free="Halogen Free", Height=2.8mm, Height - Seated (Max)=0.11inch, Length=0.236inch, Max DC Current=920mA, Mount="Surface Mount", Number of Pins=2, Packaging="Tape and Reel", Pricing 1="1=0.36, 10=0.317, 100=0.2182, 500=0.18648, 1000=0.14283 (USD)", REACH SVHC=Unknown, RMS Current (Irms)=920mA, Shielding=Shielded, Stock 1=42241, Supplier 1=Digi-Key, Termination=SMD/SMT, Tolerance=20%, Width=0.236inch
L2: "FERRITE BEAD 120 OHM 0603 1LN", Case/Package=0603, Case Code (Metric)=1608, Current Rating=3A, DC Resistance (DCR)=25mR, Frequency=100MHz, Manufacturer=Murata, Max Operating Temperature=125°C, Min Operating Temperature=-55°C, Package Quantity=1, Supplier Part Number 1=490-3996-1-ND, Tolerance=25%, Case Code (Imperial)=0603, Category="Ferrite Beads and Chips", ComponentLink1Description=https://datasheet.ciiva.com/1012/l0110s0100blm18s-1012624.pdf?src-supplier=Digi-Key, ComponentLink1URL=https://datasheet.ciiva.com/1012/l0110s0100blm18s-1012624.pdf?src-supplier=Digi-Key, ComponentLink2Description=https://datasheet.ciiva.com/18093/getdatasheetpartid-295885-18093249.pdf?src-supplier=Verical, ComponentLink2URL=https://datasheet.ciiva.com/18093/getdatasheetpartid-295885-18093249.pdf?src-supplier=Verical, ComponentLink3Description=https://datasheet.ciiva.com/11799/0900766b811b5866-11799181.pdf?src-supplier=RSComponents, ComponentLink3URL=https://datasheet.ciiva.com/11799/0900766b811b5866-11799181.pdf?src-supplier=RSComponents, ComponentLink4Description=https://datasheet.ciiva.com/41449/001171723-da-01-en-chip-drossel0603-120r-3000ma-1-6x0-8mm-41449353.pdf?src-supplier=Conrad, ComponentLink4URL=https://datasheet.ciiva.com/41449/001171723-da-01-en-chip-drossel0603-120r-3000ma-1-6x0-8mm-41449353.pdf?src-supplier=Conrad, ComponentLink5Description=https://datasheet.ciiva.com/41449/001172312-da-01-en-drossel-0603-120r-1-6x0-8mm-10000st-41449675.pdf?src-supplier=Conrad, ComponentLink5URL=https://datasheet.ciiva.com/41449/001172312-da-01-en-drossel-0603-120r-1-6x0-8mm-10000st-41449675.pdf?src-supplier=Conrad, ComponentLink6Description=https://datasheet.ciiva.com/1012/l0110s0100blm18s-1012625.pdf?src-supplier=Digi-Key, ComponentLink6URL=https://datasheet.ciiva.com/1012/l0110s0100blm18s-1012625.pdf?src-supplier=Digi-Key, ComponentLink7Description=https://datasheet.ciiva.com/8021/5151-8021511.pdf?src-supplier=Element14, ComponentLink7URL=https://datasheet.ciiva.com/8021/5151-8021511.pdf?src-supplier=Element14, ComponentLink8Description=https://datasheet.ciiva.com/8021/5151-8021512.pdf?src-supplier=Element14, ComponentLink8URL=https://datasheet.ciiva.com/8021/5151-8021512.pdf?src-supplier=Element14, ComponentLink9Description=https://datasheet.ciiva.com/14122/blm-series-eng-tds-14122906.pdf?src-supplier=Distrelec, ComponentLink9URL=https://datasheet.ciiva.com/14122/blm-series-eng-tds-14122906.pdf?src-supplier=Distrelec, ComponentLink10Description=https://datasheet.ciiva.com/16395/l0110s0100blm18s-16395498.pdf?src-supplier=Future+Electronics, ComponentLink10URL=https://datasheet.ciiva.com/16395/l0110s0100blm18s-16395498.pdf?src-supplier=Future+Electronics, ComponentLink11Description=https://datasheet.ciiva.com/1012/l0110s0100blm18s-1012623.pdf?src-supplier=Digi-Key, ComponentLink11URL=https://datasheet.ciiva.com/1012/l0110s0100blm18s-1012623.pdf?src-supplier=Digi-Key, ComponentLink12Description=https://datasheet.ciiva.com/17246/l0110s0100blm18s-17246943.pdf?src-supplier=Avnet+Europe, ComponentLink12URL=https://datasheet.ciiva.com/17246/l0110s0100blm18s-17246943.pdf?src-supplier=Avnet+Europe, Core Material=Ferrite, DC Resistance-Max=25mR, Depth=0.8mm, Height=0.8mm, Impedance=120R, Lead Free="Lead Free", Length=1.6mm, Manufacturer Part Number=BLM18SG121TN1D, Material=Steel,Ferrite, Max Current Rating=3A, Max DC Current=3A, Number of Circuits=1, Number of Lines=1, Number of Pins=2, Packaging="Tape and Reel", Pricing 1="1=0.13000, 10=0.10600, 25=0.08240, 50=0.06820, 100=0.05880, 250=0.04700, 500=0.04230, 1000=0.03525, 5000=0.03290 (USD)", REACH SVHC="No SVHC", RoHS=Yes, RoHS Compliant=Yes, Series=BLM18S, Shielding=Unshielded, Stock 1=108230, Supplier 1=Digi-Key, Termination=SMD/SMT, Test Frequency=100MHz, Width=0.8mm
LED1: "ADDRESS LED DISCRETE SERIAL RGB", Color=Blue,Green,Red, Manufacturer=SparkFun, Supplier Part Number 1=1568-1800-ND, ComponentLink1Description=https://media.digikey.com/pdf/Data%20Sheets/Sparkfun%20PDFs/WS2812_Breakout_Hookup_Guide.pdf?src-supplier=Digi-Key, ComponentLink1URL=https://media.digikey.com/pdf/Data%20Sheets/Sparkfun%20PDFs/WS2812_Breakout_Hookup_Guide.pdf?src-supplier=Digi-Key, ComponentLink2Description=http://cdn.sparkfun.com/datasheets/Components/LED/WS2812.pdf?src-supplier=Digi-Key, ComponentLink2URL=http://cdn.sparkfun.com/datasheets/Components/LED/WS2812.pdf?src-supplier=Digi-Key, Interface=Serial, Length=5mm, Manufacturer Part Number=COM-11821, Mount="Surface Mount", Number of LEDs=1, Pricing 1="1=0.50000 (USD)", RoHS=No, Stock 1=2537, Supplier 1=Digi-Key, Width=5mm
P2 P4 P5 P6 P7 P8 P9 P19 P20: "Test Point ON"
Q2 Q3: "TRANS NPN 40V 0.6A SMD SOT23-3", Case/Package=SOT-23, Collector Base Voltage (VCBO)=75V, Collector Emitter Breakdown Voltage=40V, Collector Emitter Saturation Voltage=1V, Continuous Collector Current=600mA, Current=1A, Emitter Base Voltage (VEBO)=6V, Frequency=300MHz, Manufacturer=Diodes, Max Operating Temperature=150°C, Max Power Dissipation=300mW, Min Operating Temperature=-55°C, Package Quantity=3000, Power Dissipation=350mW, Supplier Part Number 1=MMBT2222A-FDIDKR-ND, Collector Emitter Voltage (VCEO)=40V, ComponentLink1Description=http://www.diodes.com/datasheets/ds30041.pdf?src-supplier=Future+Electronics, ComponentLink1URL=http://www.diodes.com/datasheets/ds30041.pdf?src-supplier=Future+Electronics, ComponentLink2Description=http://www.diodes.com/datasheets/ds30041.pdf?src-supplier=Avnet, ComponentLink2URL=http://www.diodes.com/datasheets/ds30041.pdf?src-supplier=Avnet, ComponentLink3Description=https://www.verical.com/server-webapp/html/getDatasheet?partID=82692&src-supplier=Verical, ComponentLink3URL=https://www.verical.com/server-webapp/html/getDatasheet?partID=82692&src-supplier=Verical, ComponentLink4Description=https://www.diodes.com/assets/Datasheets/ds30041.pdf?src-supplier=Digi-Key, ComponentLink4URL=https://www.diodes.com/assets/Datasheets/ds30041.pdf?src-supplier=Digi-Key, ComponentLink5Description=http://www.diodes.com/datasheets/ds30041.pdf?src-supplier=Avnet+Europe, ComponentLink5URL=http://www.diodes.com/datasheets/ds30041.pdf?src-supplier=Avnet+Europe, ComponentLink6Description=http://www.diodes.com/datasheets/ds30041.pdf?src-supplier=Element14, ComponentLink6URL=http://www.diodes.com/datasheets/ds30041.pdf?src-supplier=Element14, Contact Plating=Matte,Tin, Current Rating=600mA, Element Configuration=Single, Gain Bandwidth Product=300MHz, Height=1mm, hFE Min=100, Lead Free="Lead Free", Length=3.05mm, Manufacturer Part Number=MMBT2222A-7-F, Max Breakdown Voltage=40V, Max Collector Current=600mA, Max Frequency=300MHz, Mount="Surface Mount", Number of Elements=1, Number of Pins=3, Packaging="Tape and Reel", Polarity=NPN, Pricing 1="1=0.15, 10=0.134, 100=0.0729, 500=0.04486, 1000=0.03059 (USD)", Radiation Hardening=No, REACH SVHC="No SVHC", Stock 1=2471182, Supplier 1=Digi-Key, Termination=SMD/SMT, Transition Frequency=300MHz, Voltage=40V, Voltage Rating (DC)=40V, Weight=0.000282oz, Width=1.4mm
Q4 Q5 Q6: "MOSFET N-CH 50V 200MA SOT-23", Case/Package=SOT-23-3, Continuous Drain Current (ID)=200mA, Drain to Source Breakdown Voltage=50V, Drain to Source Resistance=3.5R, Gate to Source Voltage (Vgs)=20V, Input Capacitance=50pF, Manufacturer="ON Semiconductor", Max Operating Temperature=150°C, Max Power Dissipation=225mW, Min Operating Temperature=-55°C, Package Quantity=1, Supplier Part Number 1=BSS138LT1GOSDKR-ND, Threshold Voltage=1.5V, ComponentLink1Description=https://datasheet.ciiva.com/22641/1596366-22641636.pdf, ComponentLink1URL=https://datasheet.ciiva.com/22641/1596366-22641636.pdf, ComponentLink2Description=https://datasheet.ciiva.com/1190/1596366-1190137.pdf, ComponentLink2URL=https://datasheet.ciiva.com/1190/1596366-1190137.pdf, ComponentLink3Description=https://datasheet.ciiva.com/15198/getdatasheetpartid-110266-15198908.pdf, ComponentLink3URL=https://datasheet.ciiva.com/15198/getdatasheetpartid-110266-15198908.pdf, ComponentLink4Description=https://datasheet.ciiva.com/8115/bss138lt1-d-8115295.pdf, ComponentLink4URL=https://datasheet.ciiva.com/8115/bss138lt1-d-8115295.pdf, ComponentLink5Description=https://datasheet.ciiva.com/8115/bss138lt1-d-8115358.pdf, ComponentLink5URL=https://datasheet.ciiva.com/8115/bss138lt1-d-8115358.pdf, ComponentLink6Description=https://datasheet.ciiva.com/1190/1596366-1190136.pdf, ComponentLink6URL=https://datasheet.ciiva.com/1190/1596366-1190136.pdf, ComponentLink7Description=https://datasheet.ciiva.com/936/bss138lt1-d-936802.pdf, ComponentLink7URL=https://datasheet.ciiva.com/936/bss138lt1-d-936802.pdf, ComponentLink8Description=https://datasheet.ciiva.com/936/bss138lt1-d-936801.pdf, ComponentLink8URL=https://datasheet.ciiva.com/936/bss138lt1-d-936801.pdf, ComponentLink9Description=https://datasheet.ciiva.com/14553/70099493-14553829.pdf, ComponentLink9URL=https://datasheet.ciiva.com/14553/70099493-14553829.pdf, ComponentLink10Description=https://datasheet.ciiva.com/936/bss138lt1-d-936803.pdf, ComponentLink10URL=https://datasheet.ciiva.com/936/bss138lt1-d-936803.pdf, ComponentLink11Description=http://www.onsemi.com/pub/Collateral/BSS138LT1-D.PDF?src-supplier=Digi-Key, ComponentLink11URL=http://www.onsemi.com/pub/Collateral/BSS138LT1-D.PDF?src-supplier=Digi-Key, ComponentLink12Description=http://www.farnell.com/datasheets/1596366.pdf?src-supplier=Element14, ComponentLink12URL=http://www.farnell.com/datasheets/1596366.pdf?src-supplier=Element14, ComponentLink13Description=http://www.alliedelec.com/m/d/b3c6fd7d92596813fe75d33dcbaaae90.pdf?src-supplier=Allied+Electronics, ComponentLink13URL=http://www.alliedelec.com/m/d/b3c6fd7d92596813fe75d33dcbaaae90.pdf?src-supplier=Allied+Electronics, ComponentLink14Description=https://www.verical.com/server-webapp/html/getDatasheet?partID=110266&src-supplier=Verical, ComponentLink14URL=https://www.verical.com/server-webapp/html/getDatasheet?partID=110266&src-supplier=Verical, ComponentLink15Description=http://www.onsemi.com/pub_link/Collateral/BSS138LT1-D.PDF?src-supplier=Avnet, ComponentLink15URL=http://www.onsemi.com/pub_link/Collateral/BSS138LT1-D.PDF?src-supplier=Avnet, Contact Plating=Tin,Matte, Current Rating=200mA, Element Configuration=Single, Halogen Free="Halogen Free", Height=1.01mm, Lead Free="Lead Free", Length=3.04mm, Manufacturer Part Number=BSS138LT1G, Nominal Vgs=1.5V, Number of Elements=1, Number of Pins=3, On-State Resistance=3.5R, Packaging="Tape and Reel", Power Dissipation=225mW, Pricing 1="1=0.27, 10=0.222, 100=0.1177, 500=0.07746, 1000=0.05267 (USD)", Radiation Hardening=No, Rds On Max=3.5R, REACH SVHC="No SVHC", Stock 1=1283212, Supplier 1=Digi-Key, Turn-Off Delay Time=20ns, Turn-On Delay Time=20ns, Voltage Rating (DC)=50V, Width=1.4mm
Q9: "MOSFET P-CH 20V 2.8A SOT-23", Manufacturer=Nexperia, Supplier Part Number 1=1727-3124-1-ND, Manufacturer Part Number=PMV65XP,215, Pricing 1="1=0.38, 10=0.28, 25=0.2452, 100=0.133, 250=0.13232, 500=0.1085, 1000=0.0805 (USD)", Stock 1=60287, Supplier 1=Digi-Key
R1 R6: library part ERJ-P06J102V, "RES SMD 1K OHM 5% 1/2W 0805", Case/Package=0805, Case Code (Metric)=2012, Manufacturer=Panasonic, Max Operating Temperature=155°C, Max Power Dissipation=500mW, Min Operating Temperature=-55°C, Package Quantity=1, Resistance=1kR, Supplier Part Number 1=P1.0KADCT-ND, Temperature Coefficient=200ppm/°C, Tolerance=5%, Voltage Rating=400V, Voltage Rating (DC)=150V, Case Code (Imperial)=0805, ComponentLink1Description=https://datasheet.ciiva.com/2474/crcwhpe3-2474640.pdf, ComponentLink1URL=https://datasheet.ciiva.com/2474/crcwhpe3-2474640.pdf, ComponentLink2Description=https://datasheet.ciiva.com/48527/crcwhpe3-48527638.pdf, ComponentLink2URL=https://datasheet.ciiva.com/48527/crcwhpe3-48527638.pdf, ComponentLink3Description=https://datasheet.ciiva.com/5547/crcwhpe3-46056-5547896.pdf, ComponentLink3URL=https://datasheet.ciiva.com/5547/crcwhpe3-46056-5547896.pdf, ComponentLink4Description=https://datasheet.ciiva.com/9112/crcwhpe3-9112140.pdf, ComponentLink4URL=https://datasheet.ciiva.com/9112/crcwhpe3-9112140.pdf, ComponentLink5Description=https://datasheet.ciiva.com/2474/crcwhpe3-2474638.pdf, ComponentLink5URL=https://datasheet.ciiva.com/2474/crcwhpe3-2474638.pdf, ComponentLink6Description=https://datasheet.ciiva.com/2474/crcwhpe3-2474639.pdf, ComponentLink6URL=https://datasheet.ciiva.com/2474/crcwhpe3-2474639.pdf, ComponentLink7Description=https://datasheet.ciiva.com/2474/crcwhpe3-2474641.pdf, ComponentLink7URL=https://datasheet.ciiva.com/2474/crcwhpe3-2474641.pdf, ComponentLink8Description=https://datasheet.ciiva.com/2474/crcwhpe3-2474642.pdf, ComponentLink8URL=https://datasheet.ciiva.com/2474/crcwhpe3-2474642.pdf, ComponentLink9Description=https://datasheet.ciiva.com/2474/crcwhpe3-2474643.pdf, ComponentLink9URL=https://datasheet.ciiva.com/2474/crcwhpe3-2474643.pdf, ComponentLink10Description=https://datasheet.ciiva.com/9051/crcwhpe3-9051301.pdf, ComponentLink10URL=https://datasheet.ciiva.com/9051/crcwhpe3-9051301.pdf, ComponentLink11Description=http://uk.rs-online.com/webdocs/12cb/0900766b812cb812.pdf?src-supplier=RSComponents, ComponentLink11URL=http://uk.rs-online.com/webdocs/12cb/0900766b812cb812.pdf?src-supplier=RSComponents, ComponentLink12Description=http://www.mouser.com/ds/2/315/AOA0000C291-1101061.pdf?src-supplier=Mouser, ComponentLink12URL=http://www.mouser.com/ds/2/315/AOA0000C291-1101061.pdf?src-supplier=Mouser, ComponentLink13Description=http://www.industrial.panasonic.com/www-data/pdf/AOA0000/AOA0000CE4.pdf?src-supplier=Element14, ComponentLink13URL=http://www.industrial.panasonic.com/www-data/pdf/AOA0000/AOA0000CE4.pdf?src-supplier=Element14, ComponentLink14Description=http://industrial.panasonic.com/www-data/pdf/AOA0000/AOA0000CE4.pdf?src-supplier=Avnet+Europe, ComponentLink14URL=http://industrial.panasonic.com/www-data/pdf/AOA0000/AOA0000CE4.pdf?src-supplier=Avnet+Europe, ComponentLink15Description=http://www.farnell.com/datasheets/2059624.pdf?src-supplier=Farnell, ComponentLink15URL=http://www.farnell.com/datasheets/2059624.pdf?src-supplier=Farnell, ComponentLink16Description=https://www.alliedelec.com/m/d/12e4be79354a6c30aae91f11e8182ea0.pdf?src-supplier=Allied+Electronics, ComponentLink16URL=https://www.alliedelec.com/m/d/12e4be79354a6c30aae91f11e8182ea0.pdf?src-supplier=Allied+Electronics, Composition="Thick Film", Contact Plating=Tin, Depth=1.25mm, Features="Automotive AEC-Q200", Height=0.6mm, Lead Free="Lead Free", Length=2mm, Manufacturer Part Number=ERJ-P06J102V, Military Standard=Not, Mount="Surface Mount", Number of Terminations=2, Packaging="Tape and Reel", Power Rating=500mW, Pricing 1="1=0.11, 10=0.103, 100=0.0396, 1000=0.0174, 2500=0.0151 (USD)", Radiation Hardening=No, REACH SVHC=Unknown, Stock 1=475568, Supplier 1=Digi-Key, Termination=SMD/SMT, Weight=0.000194oz, Width=0.049inch